# Altium PCB SYNCBOX.PcbDoc (part 2 of 6)
Units mil, origin at the board's own origin, x right, y up, seen from the top; angles counter-clockwise.
Board outline 8392.2 x 6163.59 mil, 6 copper layers (L1, L2, L3, L4 (PWR), L5, L6), stack 60.709 mil thick; 316 components, 422 nets, 1421 pads, 499 vias.
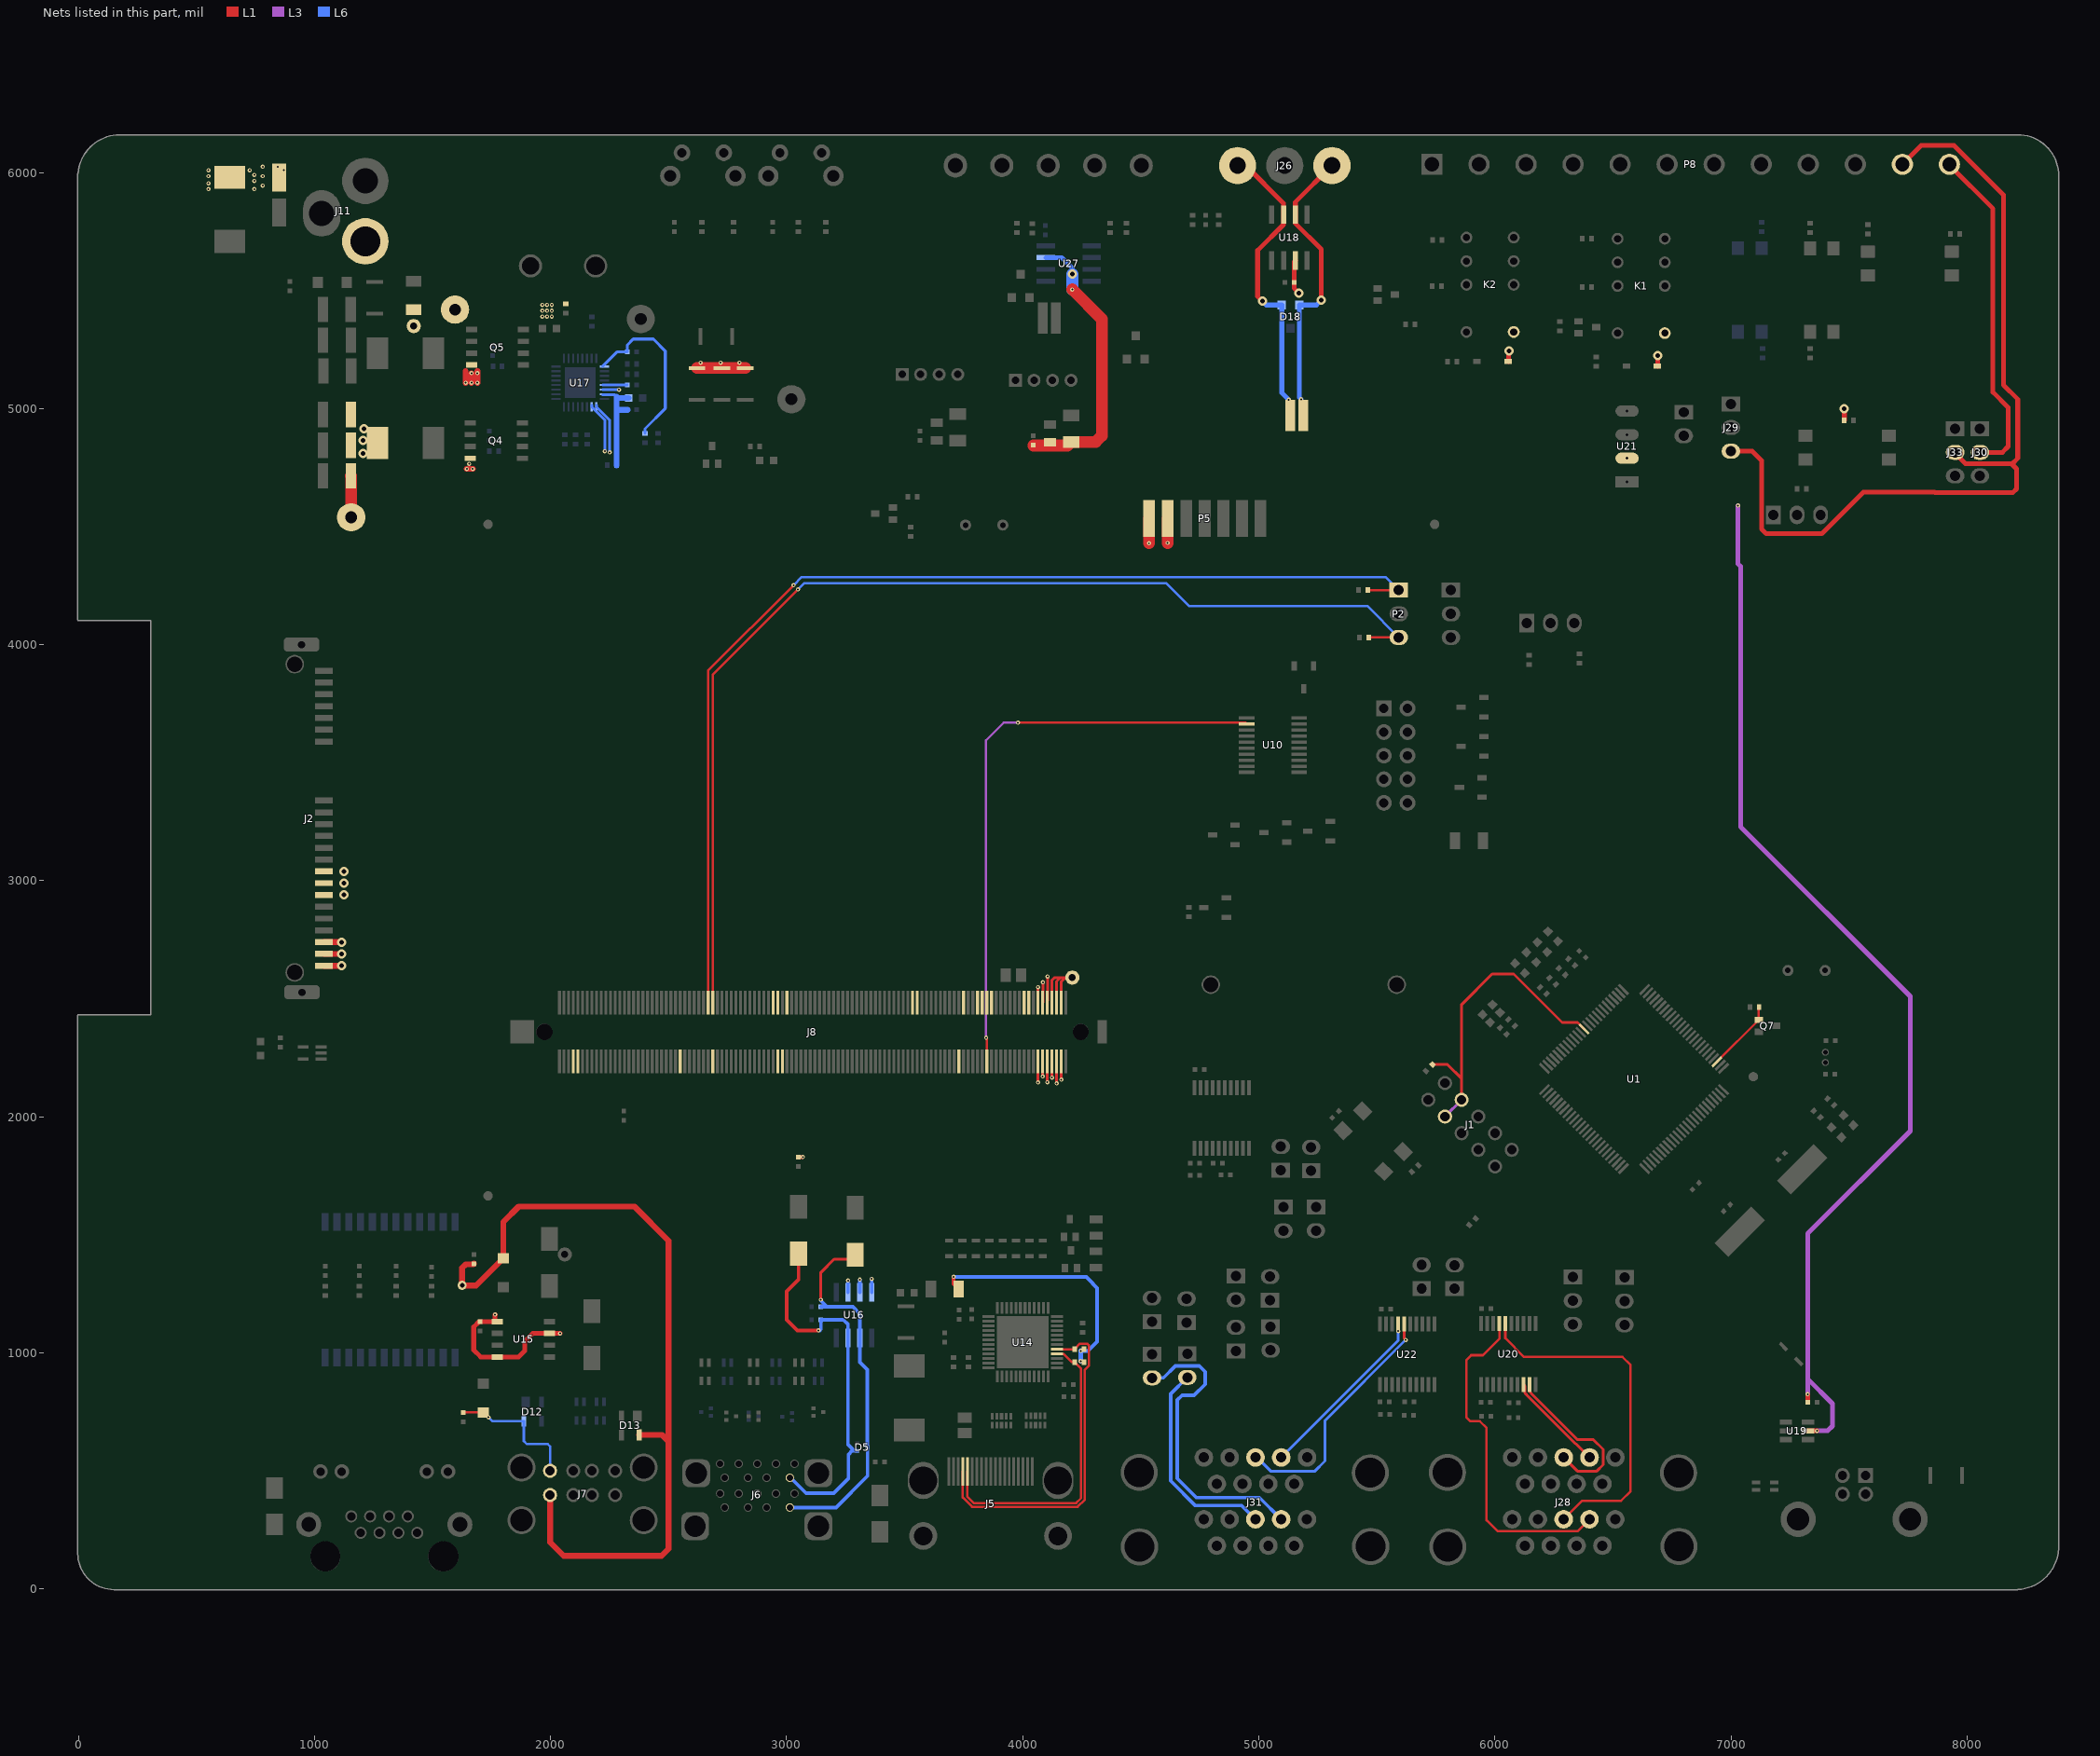
[diagram p6: the nets of this part, all layers, seen from the top]

## Part data
BT1: library part CR2032, "BATTERY HOLDER COIN 20MM PC PIN", Manufacturer 2="Memory Protection Devices", Manufacturer Part Number=BS-7, Operating Temperature="-55°C ~ 105°C", Standard Package=100, Supplier Part Number 1=BS7, .Checked PCB=CHK, .Checked SCH=CHK, Battery Cell Size="Coin, 20.0mm", Battery Series=2032, Battery Type, Function="Coin Cell, Holder", Category="Battery Products", ComponentLink1Description=http://www.memoryprotectiondevices.com/datasheets/BS-7-datasheet.pdf?src-supplier=Digi-Key, ComponentLink1URL=http://www.memoryprotectiondevices.com/datasheets/BS-7-datasheet.pdf?src-supplier=Digi-Key, Description 2="BATTERY HOLDER COIN 20MM PC PIN", Family="Battery Holders, Clips, Contacts", Featured Product="Top and Side Loading Coin Cell Holders Ultra-Low CR2016 Coin Cell Holder Covered 8-AA Battery Pack Cylindrical Battery Contacts", For Use With="P188-ND  /                                                          - BATTERY LITHIUM 3V COIN 20MM /                                                      P138-ND  /                                                          - BATTERY LITHIUM 3V COIN 20MM /                                                      P189-ND  /                                                          - BATTERY LITHIUM 3V COIN 20MM /                                                      N138-ND  /                                                          - BATTERY LITHIUM 3V COIN 20MM /                                                      N188-ND  /                                                          - BATTERY LITHIUM 3V COIN 20MM /                                                      P186-ND  /                                                          - BATTERY LITHIUM 3V COIN 20MM /                                                      SY189-ND  /                                                          - BATTERY LITHIUM 3V COIN 20MM /                                                      SY138-ND  /                                                          - BATTERY LITHIUM 3V COIN 20MM /                                                      SY188-ND  /                                                          - BATTERY LITHIUM 3V COIN 20MM /                                                      N189-ND  /                                                          - BATTERY LITHIUM 3V COIN 20MM /                                                      P037-ND  /                                                          - BATTERY LITHIUM 3V COIN 20MM /                                                      N037-ND  /                                                          - BATTERY LITHIUM 3V COIN 20MM /                                                      ECR2032BP-ND  /                                                          - BATTERY LITH 3V COIN 20MM", Height Above Board="0.354\" (9.00mm)", Manufacturer Part Number 2=BS-7, Mounting Type="PCB, Through Hole", Number of Cells=1, Online Catalog="Battery Holders, Clips, Contacts", Other Names=BS7, Product Training Modules="Battery Holders for Wireless Applications", RoHS Information="Cert of Compliance", Stock 2=0, Style="Holder (Open)", Supplier 1="Electro Sonic", Supplier 2="Perfect Parts", Supplier Part Number 2=BS-7, Termination Style="PC Pin"
C1 C2: library part CL05C120JB5NNNC, "CAP CER 12PF 50V C0G 5% 0402", Supplier Part Number=1276-1178-1-ND, Manufacturer Part Number=CL05C120JB5NNNC
C3 C4: library part CL05C180JB5NNNC, "CAP CER 18PF 50V C0G/NP0 0402", Manufacturer 1="Samsung Electro-Mechanics", Operating Temperature="-55°C ~ 125°C", Package / Case="0402 (1005 Metric)", Ratings=-, Supplier Part Number 1=1276-1140-1-ND, Temperature Coefficient="C0G, NP0", Tolerance=±5%, Voltage - Rated=50V, Applications="General Purpose", Category=Capacitors, ComponentLink1Description=http://www.samsungsem.com/kr/support/product-search/mlcc/CL05C180JB5NNNC.jsp, ComponentLink1URL=http://www.samsungsem.com/kr/support/product-search/mlcc/CL05C180JB5NNNC.jsp, Description 1="CAP CER 18PF 50V C0G/NP0 0402", Features=-, Height - Seated (Max)=-, Lead Spacing=-, Lead Style=-, Manufacturer Part Number 1=CL05C180JB5NNNC, Mounting Type="Surface Mount, MLCC", Notification="Current market demand for these product types have resulted in fluctuating and extending lead times. Lead times may differ.", Packaging="Cut Tape (CT)", Part Status=Active, Pricing 1="1=0.1, 10=0.034, 100=0.0154, 500=0.01114, 1000=0.00888, 2500=0.00814, 5000=0.00753 (USD)", RoHS="RoHS Compliant", Size / Dimension="0.039\" L x 0.020\" W (1.00mm x 0.50mm)", Stock 1=89300, Supplier 1=Digi-Key, Thickness (Max)="0.022\" (0.55mm)"
C5 C7 C8 C13 C29 C30 C31 C32 C33 C36 C37 C41 C46 C47 C55 C57 C58 C59 C61 C62: library part CL05A104KA5NNNC, "CAP CER 0.1UF 50V X8R 0603", Manufacturer 1="Samsung Electro-Mechanics", Operating Temperature="-55°C ~ 85°C", Package / Case="0402 (1005 Metric)", Ratings=-, Supplier Part Number 1=1276-1043-6-ND, Temperature Coefficient=X5R, Tolerance=±10%, Voltage - Rated=25V, Applications="General Purpose", Category=Capacitors, ComponentLink1Description=http://www.samsungsem.com/kr/support/product-search/mlcc/CL05A104KA5NNNC.jsp, ComponentLink1URL=http://www.samsungsem.com/kr/support/product-search/mlcc/CL05A104KA5NNNC.jsp, Description 1="CAP CER 0.1UF 25V X5R 0402", Features=-, Height - Seated (Max)=-, Lead Spacing=-, Lead Style=-, Manufacturer Part Number 1=CL05A104KA5NNNC, Mounting Type="Surface Mount, MLCC", Notification="Current market demand for these product types have resulted in fluctuating and extending lead times. Lead times may differ.", Packaging=Digi-Reel®, Part Status=Active, Pricing 1="1=0.1, 10=0.04, 100=0.0176, 500=0.0126, 1000=0.0099, 2500=0.009, 5000=0.00828 (USD)", RoHS="RoHS Compliant", Size / Dimension="0.039\" L x 0.020\" W (1.00mm x 0.50mm)", Stock 1=100000, Supplier 1=Digi-Key, Thickness (Max)="0.022\" (0.55mm)"
  C8 C13: .Checked PCB=USED, .Checked SCH=USED
  C29: .Checked SCH=CHK
C6 C9 C10 C11 C12 C16 C17 C18 C19 C64 C65 C66 C68 C69 C70 C71 C72 C73 C74 C75 C76 C77 C78 C79 C80 C81 C82 C83: library part CL05A104KA5NNNC, "CAP CER 0.1UF 25V X5R 0402", Manufacturer 1="Samsung Electro-Mechanics", Operating Temperature="-55°C ~ 85°C", Package / Case="0402 (1005 Metric)", Ratings=-, Supplier Part Number 1=1276-1043-6-ND, Temperature Coefficient=X5R, Tolerance=±10%, Voltage - Rated=25V, Applications="General Purpose", Category=Capacitors, ComponentLink1Description=http://www.samsungsem.com/kr/support/product-search/mlcc/CL05A104KA5NNNC.jsp, ComponentLink1URL=http://www.samsungsem.com/kr/support/product-search/mlcc/CL05A104KA5NNNC.jsp, Description 1="CAP CER 0.1UF 25V X5R 0402", Features=-, Height - Seated (Max)=-, Lead Spacing=-, Lead Style=-, Manufacturer Part Number 1=CL05A104KA5NNNC, Mounting Type="Surface Mount, MLCC", Notification="Current market demand for these product types have resulted in fluctuating and extending lead times. Lead times may differ.", Packaging=Digi-Reel®, Part Status=Active, Pricing 1="1=0.1, 10=0.04, 100=0.0176, 500=0.0126, 1000=0.0099, 2500=0.009, 5000=0.00828 (USD)", RoHS="RoHS Compliant", Size / Dimension="0.039\" L x 0.020\" W (1.00mm x 0.50mm)", Stock 1=100000, Supplier 1=Digi-Key, Thickness (Max)="0.022\" (0.55mm)"
  C6 C9 C10 C11 C12 C16 C17 C18 C19 C64 C66 C68 C69 C70 C71 C72 C73 C74 C75 C76 C77 C78 C79 C80 C81 C82: .Checked SCH=CHK
C14 C15: library part C1206X102KGRACAUTO, "CAP CER 1206 1NF 2000V X7R 10% F", Manufacturer 1=KEMET, Operating Temperature="-55°C ~ 125°C", Package / Case="1206 (3216 Metric)", Ratings=AEC-Q200, Supplier Part Number 1=399-16730-1-ND, Temperature Coefficient=X7R, Tolerance=±10%, Voltage - Rated="2000V (2kV)", .Checked PCB=USED, .Checked SCH=USED, Applications="Automotive, Boardflex Sensitive", Category=Capacitors, ComponentLink1Description=https://api.kemet.com/component-edge/download/datasheet/C1206X102KGRACAUTO.pdf, ComponentLink1URL=https://api.kemet.com/component-edge/download/datasheet/C1206X102KGRACAUTO.pdf, Description 1="CAP CER 1206 1NF 2000V X7R 10% F", Failure Rate=-, Features="Low ESL, Soft Termination, High Voltage", Height - Seated (Max)=-, Lead Spacing=-, Lead Style=-, Manufacturer Part Number 1=C1206X102KGRACAUTO, Mounting Type="Surface Mount, MLCC", Packaging="Cut Tape (CT)", Part Status=Active, Pricing 1="1=0.79, 10=0.58, 100=0.3974, 500=0.31464, 1000=0.26496 (USD)", RoHS="RoHS Compliant", Size / Dimension="0.130\" L x 0.063\" W (3.30mm x 1.60mm)", Stock 1=7503, Supplier 1=Digi-Key, Thickness (Max)="0.073\" (1.85mm)"
C20 C21 C22 C23 C24 C25 C26 C27: library part C1608X8R1H104K08, "CAP CER 0.1UF 25V X5R 0402", Manufacturer 1="TDK Corporation", Manufacturer_Part_Number=C1608X8R1H104K080AB, Operating Temperature="-55°C ~ 150°C", Package / Case="0603 (1608 Metric)", Ratings=-, Supplier Part Number 1=445-8818-1-ND, Temperature Coefficient=X8R, Tolerance=±10%, Voltage - Rated=50V, .Checked SCH=CHK, Applications="General Purpose", Built_By=EMA_UL_Team, C="Copyright (C) 2015 Accelerated Designs. All rights reserved", Category=Capacitors, Description 1="CAP CER 0.1UF 50V X8R 0603", Failure Rate=-, Features="High Temperature", Height - Seated (Max)=-, Lead Spacing=-, Lead Style=-, Manufacturer Part Number 1=C1608X8R1H104K080AB, Mounting Type="Surface Mount, MLCC", Notification="Current market demand for these product types have resulted in fluctuating and extending lead times. Lead times may differ.", Packaging="Cut Tape (CT)", Part Status=Active, Pricing 1="1=0.32, 10=0.216, 100=0.1093, 500=0.07476, 1000=0.06613 (USD)", RefDes=RefDes, RoHS="RoHS Compliant", Size / Dimension="0.063\" L x 0.032\" W (1.60mm x 0.80mm)", Stock 1=5228, Supplier 1=Digi-Key, Thickness (Max)="0.035\" (0.90mm)", Type=DEV, Vendor=TDK
C28 C43 C44 C63: library part C3216JB1V106K160, "CAP CER 10UF 35V JB 1206", Manufacturer 1="TDK Corporation", Manufacturer_Part_Number=C3216JB1V106K160AB, Operating Temperature="-25°C ~ 85°C", Package / Case="1206 (3216 Metric)", Ratings=-, Supplier Part Number 1=445-11736-1-ND, Temperature Coefficient=JB, Tolerance=±10%, Voltage - Rated=35V, Applications="General Purpose", Built_By=EMA_UL_Team, C="Copyright (C) 2015 Accelerated Designs. All rights reserved", Category=Capacitors, ComponentLink1Description=https://product.tdk.com/info/en/catalog/datasheets/mlcc_commercial_general_en.pdf, ComponentLink1URL=https://product.tdk.com/info/en/catalog/datasheets/mlcc_commercial_general_en.pdf, Description 1="CAP CER 10UF 35V JB 1206", Failure Rate=-, Features="Low ESL", Height - Seated (Max)=-, Lead Spacing=-, Lead Style=-, Manufacturer Part Number 1=C3216JB1V106K160AB, Mounting Type="Surface Mount, MLCC", Notification="Current market demand for these product types have resulted in fluctuating and extending lead times. Lead times may differ.", Packaging="Cut Tape (CT)", Part Status=Active, Pricing 1="1=0.92, 10=0.648, 100=0.4269, 500=0.31626, 1000=0.26881 (USD)", RefDes=RefDes, RoHS="RoHS Compliant", Size / Dimension="0.126\" L x 0.063\" W (3.20mm x 1.60mm)", Stock 1=5285, Supplier 1=Digi-Key, Thickness (Max)="0.069\" (1.75mm)", Type=DEV, Vendor=TDK
  C28: .Checked SCH=CHK
C34 C35 C38 C39: library part PCG1C470MCL1GS, "CAP ALUM POLY 47UF 20% 16V SMD", ESR (Equivalent Series Resistance)="40 mOhm", Lifetime @ Temp.="2000 Hrs @ 105°C", Manufacturer 1=Nichicon, Operating Temperature="-55°C ~ 105°C", Package / Case="Radial, Can - SMD", Ratings=-, Supplier Part Number 1=493-3095-6-ND, Tolerance=±20%, Applications="General Purpose", Category=Capacitors, ComponentLink1Description=http://nichicon-us.com/english/products/pdfs/e-pcg.pdf, ComponentLink1URL=http://nichicon-us.com/english/products/pdfs/e-pcg.pdf, Description 1="CAP ALUM POLY 47UF 20% 16V SMD", Height - Seated (Max)="0.236\" (6.00mm)", Lead Spacing=-, Manufacturer Part Number 1=PCG1C470MCL1GS, Mounting Type="Surface Mount", Packaging=Digi-Reel®, Part Status=Active, Pricing 1="1=1.42, 10=1.123, 100=0.8422, 500=0.63636 (USD)", RoHS="RoHS Compliant", Size / Dimension="0.197\" Dia (5.00mm)", Stock 1=4045, Supplier 1=Digi-Key, Surface Mount Land Size="0.209\" L x 0.209\" W (5.30mm x 5.30mm)", Type=Polymer
C40: library part C1608X5R0J106M, "CAP CER 10UF 6.3V X5R 20% 0603", Capacitance=10µF, Manufacturer="TDK Corporation", Operating Temperature="-55°C ~ 85°C", Package / Case="0603 (1608 Metric)", Ratings=-, Supplier Part Number=445-4112-1-ND, Temperature Coefficient=X5R, Tolerance=±20%, Voltage - Rated=6.3V, Applications="General Purpose", Category=Capacitors, ComponentLink1Description=http://www.tdk.com/pdf/general_B11.pdf, ComponentLink1URL=http://www.tdk.com/pdf/general_B11.pdf, Features="Low ESR", Height - Seated (Max)=-, Lead Spacing=-, Lead Style=-, Manufacturer Part Number=C1608X5R0J106M, Mounting Type="Surface Mount, MLCC", Packaging="Cut Tape (CT)", Price 1k [$]=0.08580, Pricing 1="1=0.46, 10=0.363, 100=0.1898, 250=0.14024, 500=0.1089, 1000=0.0858 (USD)", RoHS="RoHS Compliant", Size / Dimension="0.063\" L x 0.031\" W (1.60mm x 0.80mm)", Stock 1=48157, Supplier=Digikey, Supplier 1=Digi-Key, Supplier Part Number 1=445-4112-1-ND, Thickness (Max)="0.037\" (0.95mm)"
C42 C45 C67: library part CGA5L3X8R1H105K1, "CAP CER 1UF 50V X8R 1206", Manufacturer 1="TDK Corporation", Manufacturer_Part_Number=CGA5L3X8R1H105K160AB, Operating Temperature="-55°C ~ 150°C", Package / Case="1206 (3216 Metric)", Ratings=AEC-Q200, Supplier Part Number 1=445-13000-1-ND, Temperature Coefficient=X8R, Tolerance=±10%, Voltage - Rated=50V, Applications=Automotive, Built_By=EMA_UL_Team, C="Copyright (C) 2015 Accelerated Designs. All rights reserved", Category=Capacitors, ComponentLink1Description=https://product.tdk.com/info/en/catalog/datasheets/mlcc_automotive_hightemp_en.pdf, ComponentLink1URL=https://product.tdk.com/info/en/catalog/datasheets/mlcc_automotive_hightemp_en.pdf, Description 1="CAP CER 1UF 50V X8R 1206", Failure Rate=-, Features="High Temperature", Height - Seated (Max)=-, Lead Spacing=-, Lead Style=-, Manufacturer Part Number 1=CGA5L3X8R1H105K160AB, Mounting Type="Surface Mount, MLCC", Packaging="Cut Tape (CT)", Part Status=Active, Pricing 1="1=0.85, 10=0.628, 100=0.4306, 500=0.34086, 1000=0.28704 (USD)", RefDes=RefDes, RoHS="RoHS Compliant", Size / Dimension="0.126\" L x 0.063\" W (3.20mm x 1.60mm)", Stock 1=3285, Supplier 1=Digi-Key, Thickness (Max)="0.071\" (1.80mm)", Type=DEV, Vendor=TDK
  C67: .Checked SCH=CHK
C48 C49 C50 C51 C52 C53: library part CL32A107MPVNNNE, "CAP CER 100UF 10V X5R 1210", Manufacturer 1="Samsung Electro-Mechanics", Manufacturer_Part_Number=C1210C107M8PACTU, Operating Temperature="-55°C ~ 85°C", Package / Case="1210 (3225 Metric)", Ratings=-, Supplier Part Number 1=1276-3364-1-ND, Temperature Coefficient=X5R, Tolerance=±20%, Voltage - Rated=10V, Applications="General Purpose", Built_By=EMA_UL_Team, C="Copyright (C) 2015 Accelerated Designs. All rights reserved", Category=Capacitors, ComponentLink1Description=http://www.samsungsem.com/kr/support/product-search/mlcc/CL32A107MPVNNNE.jsp, ComponentLink1URL=http://www.samsungsem.com/kr/support/product-search/mlcc/CL32A107MPVNNNE.jsp, Description 1="CAP CER 100UF 10V X5R 1210", Features=-, Height - Seated (Max)=-, Lead Spacing=-, Lead Style=-, Manufacturer Part Number 1=CL32A107MPVNNNE, Mounting Type="Surface Mount, MLCC", Notification="Current market demand for these product types have resulted in fluctuating and extending lead times. Lead times may differ.", Packaging="Cut Tape (CT)", Part Status=Active, Pricing 1="1=1.23, 10=0.97, 100=0.7277, 500=0.54984 (USD)", RefDes=RefDes, RoHS="RoHS Compliant", Size / Dimension="0.126\" L x 0.098\" W (3.20mm x 2.50mm)", Stock 1=10000, Supplier 1=Digi-Key, Thickness (Max)="0.110\" (2.80mm)", Type=DEV, Vendor=Kemet
C54: library part C1005X7R1C103K, "CAP CER 10000PF 16V X7R 10% 0402", Capacitance=10000pF, Manufacturer="TDK Corporation", Operating Temperature="-55°C ~ 125°C", Package / Case="0402 (1005 Metric)", Ratings=-, Supplier Part Number=445-1262-1-ND, Temperature Coefficient=X7R, Tolerance=±10%, Voltage - Rated=16V, Applications="General Purpose", Category=Capacitors, ComponentLink1Description=http://www.tdk.co.jp/tefe02/e412_c.pdf, ComponentLink1URL=http://www.tdk.co.jp/tefe02/e412_c.pdf, Features=-, Height - Seated (Max)=-, Lead Spacing=-, Lead Style=-, Manufacturer Part Number=C1005X7R1C103K, Mounting Type="Surface Mount, MLCC", Packaging="Cut Tape (CT)", Price 1k [$]=0.00416, Pricing 1="1=0.08, 10=0.05, 100=0.018, 250=0.013, 500=0.0096, 1000=0.0065 (USD)", RoHS="RoHS Compliant", Size / Dimension="0.039\" L x 0.020\" W (1.00mm x 0.50mm)", Stock 1=511497, Supplier=Digikey, Supplier 1=Digi-Key, Supplier Part Number 1=445-1262-1-ND, Thickness (Max)="0.022\" (0.55mm)"
C56 C60: library part CL21A226MOCLRNC, "CAP CER 22UF 16V X5R 0805", Manufacturer 1="Samsung Electro-Mechanics", Operating Temperature="-55°C ~ 85°C", Package / Case="0805 (2012 Metric)", Ratings=-, Supplier Part Number 1=1276-6780-1-ND, Temperature Coefficient=X5R, Tolerance=±20%, Voltage - Rated=16V, Applications="General Purpose", Category=Capacitors, ComponentLink1Description=http://www.samsungsem.com/kr/support/product-search/mlcc/CL21A226MOCLRNC.jsp, ComponentLink1URL=http://www.samsungsem.com/kr/support/product-search/mlcc/CL21A226MOCLRNC.jsp, Description 1="CAP CER 22UF 16V X5R 0805", Features="Low Profile", Height - Seated (Max)=-, Lead Spacing=-, Lead Style=-, Manufacturer Part Number 1=CL21A226MOCLRNC, Mounting Type="Surface Mount, MLCC", Notification="Current market demand for these product types have resulted in fluctuating and extending lead times. Lead times may differ.", Packaging="Cut Tape (CT)", Part Status=Active, Pricing 1="1=0.34, 10=0.233, 100=0.132, 500=0.09318, 1000=0.08153 (USD)", RoHS="RoHS Compliant", Size / Dimension="0.079\" L x 0.049\" W (2.00mm x 1.25mm)", Stock 1=40000, Supplier 1=Digi-Key, Thickness (Max)="0.037\" (0.95mm)"
D1 D2 D27: library part "LS Q976-NR-1", "LED RED DIFFUSED 0603 SMD", Color=Red, Current - Test=20mA, Lens Color=White, Manufacturer 1="OSRAM Opto Semiconductors Inc.", Millicandela Rating=104mcd, Package / Case="0603 (1608 Metric)", Supplier Device Package=0603, Supplier Part Number 1=475-2512-1-ND, Voltage - Forward (Vf) (Typ)=2V, Category=Optoelectronics, ComponentLink1Description=https://dammedia.osram.info/media/resource/hires/osram-dam-2493499/LS%20Q976.pdf, ComponentLink1URL=https://dammedia.osram.info/media/resource/hires/osram-dam-2493499/LS%20Q976.pdf, Description 1="LED RED DIFFUSED 0603 SMD", Features=-, Height (Max)=0.80mm, LatestRevisionDate=08-Jul-2005, LatestRevisionNote="Mech Layer 1 removed.", Lens Style/Size="Rectangle with Flat Top, 1.00mm x 0.80mm", Lens Transparency=Diffused, Manufacturer Part Number 1="LS Q976-NR-1", Mounting Type="Surface Mount", PackageDescription="LED; 2 Leads", PackageReference=LED-0, Packaging="Cut Tape (CT)", Part Status=Active, Pricing 1="1=0.38, 10=0.274, 25=0.202, 100=0.1444, 250=0.0982, 500=0.08664, 1000=0.06787 (USD)", Published=8-Jun-2000, Publisher="Altium Limited", RoHS="RoHS Compliant", Size / Dimension="1.60mm L x 0.80mm W", Stock 1=127302, Supplier 1=Digi-Key, Viewing Angle=160°, Wavelength - Dominant=633nm, Wavelength - Peak=645nm
  D27: .Checked SCH=CHK
D3: "LED RED DIFFUSED 1608 SMD", Color=Red, Current - Test=20mA, Lens Color=White, Manufacturer 1="Rohm Semiconductor", Millicandela Rating=40mcd, Package / Case="0603 (1608 Metric)", Supplier Device Package="1608 (0603)", Voltage - Forward (Vf) (Typ)=2.2V, .Checked PCB=CHK, .Checked SCH=CHK, Category=Optoelectronics, ComponentLink1Description=http://www.rohm.com/web/global/datasheet/SML-D12V1W?src-supplier=Digi-Key, ComponentLink1URL=http://www.rohm.com/web/global/datasheet/SML-D12V1W?src-supplier=Digi-Key, ComponentLink2Description=https://www.rohm.com/datasheet/SML-D12V1W?src-supplier=Digi-Key, ComponentLink2URL=https://www.rohm.com/datasheet/SML-D12V1W?src-supplier=Digi-Key, Description 1="LED RED DIFFUSED 1608 SMD", Family="LED Indication - Discrete", Features=-, Height (Max)=0.65mm, Lens Style/Size="Rectangle with Flat Top, 1.20mm x 0.80mm", Lens Transparency=Diffused, Manufacturer Part Number 1=SML-D12V1WT86, Mounting Type="Surface Mount", Packaging="Tape & Reel (TR)", Pricing 1="3000=0.0245, 6000=0.023, 12000=0.0217, 18000=0.0205, 30000=0.0199 (USD)", Series=SML-D12, Size / Dimension="1.60mm L x 0.80mm W", Stock 1=3000, Supplier 1=Avnet, Supplier Part Number 1=SML-D12V1WT86, Viewing Angle=-, Wavelength - Dominant=630nm, Wavelength - Peak=-
D4 D15: "DIODE SCHOTTKY 60V 5A SMC", Capacitance @ Vr, F="300pF @ 4V, 1MHz", Current - Average Rectified (Io)=5A, Current - Reverse Leakage @ Vr="500µA @ 60V", Manufacturer="Diodes Inc", Package / Case="DO-214AB, SMC", Supplier Device Package=SMC, Supplier Part Number=B560C-FDICT-ND, Voltage - DC Reverse (Vr) (Max)=60V, Voltage - Forward (Vf) (Max) @ If="700mV @ 5A", Category="Discrete Semiconductor Products", ComponentLink1Description=http://www.diodes.com/datasheets/ds13012.pdf, ComponentLink1URL=http://www.diodes.com/datasheets/ds13012.pdf, Diode Type=Schottky, Family="Diodes, Rectifiers - Single", Manufacturer Part Number=B560C-13-F, Mounting Type="Surface Mount", Packaging="Cut Tape (CT)", Price 1k [$]=0.42900, Pricing 1="1=0.99, 10=0.884, 100=0.702, 250=0.611, 500=0.546, 1000=0.429 (USD)", Reverse Recovery Time (trr)=-, RoHS="RoHS Compliant", Speed="Fast Recovery =< 500ns, > 200mA (Io)", Stock 1=37770, Supplier=Digikey, Supplier 1=Digi-Key, Supplier Part Number 1=B560C-FDICT-ND
  D4: .Checked SCH=CHK
D5 D6 D7 D8 D9 D10 D11: "TVS DIODE 5.3V 15V TSFP-3", Base Part Number=ESD5V3, Capacitance @ Frequency="0.4pF @ 1MHz", Current - Peak Pulse (10/1000µs)="3A (8/20µs)", Manufacturer 1="Infineon Technologies", Operating Temperature="-40°C ~ 125°C (TJ)", Package / Case=SOT-723, Power - Peak Pulse=-, Power Line Protection=No, Supplier Device Package=PG-TSFP-3, Supplier Part Number 1=ESD5V3U2U03FH6327XTSA1CT-ND, Voltage - Breakdown (Min)=6V, Voltage - Clamping (Max) @ Ipp=15V, Voltage - Reverse Standoff (Typ)="5.3V (Max)", Applications="General Purpose", Category="Circuit Protection", ComponentLink1Description=https://www.infineon.com/dgdl/esd5v3u2useries.pdf?folderId=db3a30431441fb5d011488a9e66f0ded&fileId=db3a30431b0626df011b0d3e3ca97dc0, ComponentLink1URL=https://www.infineon.com/dgdl/esd5v3u2useries.pdf?folderId=db3a30431441fb5d011488a9e66f0ded&fileId=db3a30431b0626df011b0d3e3ca97dc0, Description 1="TVS DIODE 5.3V 15V TSFP-3", Manufacturer Part Number 1=ESD5V3U2U03FH6327XTSA1, Mounting Type="Surface Mount", Packaging="Cut Tape (CT)", Part Status=Active, Pricing 1="1=0.38, 10=0.311, 100=0.2118, 500=0.15886, 1000=0.11915 (USD)", RoHS="RoHS Compliant", Stock 1=21994, Supplier 1=Digi-Key, Type=Zener
  D6 D7 D8 D9 D10 D11: .Checked PCB=USED, .Checked SCH=USED
D12 D13: "DIODE BRIDGE 40V 200MA SOT 143", Base Part Number=BAS4002, Manufacturer 1="Infineon Technologies", Operating Temperature="150°C (TJ)", Package / Case="TO-253-4, TO-253AA", Supplier Device Package=PG-SOT143-4, Supplier Part Number 1=BAS4002ARPPE6327HTSA1DKR-ND, .Checked PCB=USED, .Checked SCH=USED, Category="Discrete Semiconductor Products", ComponentLink1Description=https://www.infineon.com/dgdl/bas4002aseries.pdf?folderId=db3a30431f848401011fcbf2ab4c04c4&fileId=db3a304329a0f6ee0129a6dc9f802b68, ComponentLink1URL=https://www.infineon.com/dgdl/bas4002aseries.pdf?folderId=db3a30431f848401011fcbf2ab4c04c4&fileId=db3a304329a0f6ee0129a6dc9f802b68, Description 1="DIODE BRIDGE 40V 200MA SOT 143", Diode Type="Single Phase", Manufacturer Part Number 1=BAS4002ARPPE6327HTSA1, Mounting Type="Surface Mount", Packaging=Digi-Reel®, Part Status=Active, Pricing 1="1=0.47, 10=0.406, 100=0.3031, 500=0.23816, 1000=0.18403 (USD)", RoHS="RoHS Compliant", Stock 1=44305, Supplier 1=Digi-Key, Technology=Standard
D14 D17 D24 D25 D26 D28 D29: library part "LW Q38E-Q1OO-3K6L-1", "LED COOL WHITE DIFFUSED 0603 SMD", Color="White, Cool", Current - Test=5mA, Lens Color=Yellow, Manufacturer 1="OSRAM Opto Semiconductors Inc.", Millicandela Rating=81mcd, Package / Case="0603 (1608 Metric)", Supplier Device Package=0603, Supplier Part Number 1=475-2831-1-ND, Voltage - Forward (Vf) (Typ)=2.85V, Category=Optoelectronics, ComponentLink1Description=https://dammedia.osram.info/media/resource/hires/osram-dam-2493068/LW%20Q38E.pdf, ComponentLink1URL=https://dammedia.osram.info/media/resource/hires/osram-dam-2493068/LW%20Q38E.pdf, Description 1="LED COOL WHITE DIFFUSED 0603 SMD", Features=-, Height (Max)=0.40mm, Lens Style/Size="Rectangle with Flat Top, 1.10mm x 0.80mm", Lens Transparency=Diffused, Manufacturer Part Number 1="LW Q38E-Q1OO-3K6L-1", Mounting Type="Surface Mount", Packaging="Cut Tape (CT)", Part Status=Active, Pricing 1="1=0.49, 10=0.354, 25=0.2888, 100=0.231, 250=0.19492, 500=0.16604, 1000=0.12994 (USD)", RoHS="RoHS Compliant", Size / Dimension="1.60mm L x 0.80mm W", Stock 1=215520, Supplier 1=Digi-Key, Viewing Angle="150°, 130°", Wavelength - Dominant=8200K, Wavelength - Peak=-
  D24 D25 D26 D28 D29: .Checked SCH=CHK
D16: "TVS DIODE 12V 19.9V SMA", Capacitance @ Frequency=-, Current - Peak Pulse (10/1000µs)=20.1A, Manufacturer 1="Bourns Inc.", Operating Temperature="-55°C ~ 150°C (TJ)", Package / Case="DO-214AC, SMA", Power - Peak Pulse=400W, Power Line Protection=No, Supplier Device Package="SMA (DO-214AC)", Supplier Part Number 1=SMAJ12ABCT-ND, Voltage - Breakdown (Min)=13.3V, Voltage - Clamping (Max) @ Ipp=19.9V, Voltage - Reverse Standoff (Typ)=12V, Applications="General Purpose", Category="Circuit Protection", ComponentLink1Description=https://www.bourns.com/docs/Product-Datasheets/SMAJ.pdf, ComponentLink1URL=https://www.bourns.com/docs/Product-Datasheets/SMAJ.pdf, Description 1="TVS DIODE 12V 19.9V SMA", LatestRevisionDate=17-Jul-2002, LatestRevisionNote="Re-released for DXP Platform.", Manufacturer Part Number 1=SMAJ12A, Mounting Type="Surface Mount", PackageDescription="Diode, Thru-Hole; 2 Leads; 0.7 in Pin Spacing", PackageReference=DIODE-0.7, Packaging="Cut Tape (CT)", Part Status=Active, Pricing 1="1=0.47, 10=0.329, 25=0.27, 100=0.216, 250=0.15712, 500=0.12766, 1000=0.0982, 2500=0.08838 (USD)", Published=8-Jun-2000, Publisher="Altium Limited", RoHS="RoHS Compliant", Stock 1=20326, Supplier 1=Digi-Key, Type=Zener
D18: "TVS DIODE 24V 40V SOT23", Capacitance @ Frequency="22pF @ 1MHz", Current - Peak Pulse (10/1000µs)="8A (8/20µs)", Manufacturer 1="Bourns Inc.", Manufacturer Part Number 1=CDSOT23-T24CAN, Operating Temperature="-40°C ~ 150°C (TJ)", Package / Case="TO-236-3, SC-59, SOT-23-3", Power - Peak Pulse=-, Power Line Protection=No, Supplier Device Package=SOT-23, Supplier Part Number 1=CDSOT23-T24CANCT-ND, Voltage - Breakdown (Min)=26.2V, Voltage - Clamping (Max) @ Ipp=40V, Voltage - Reverse Standoff (Typ)=24V, .Checked SCH=CHK, Applications=CAN, Category="Circuit Protection", ComponentLink1Description=https://www.bourns.com/docs/Product-Datasheets/CDSOT23-T24CAN.pdf, ComponentLink1URL=https://www.bourns.com/docs/Product-Datasheets/CDSOT23-T24CAN.pdf, Description 1="TVS DIODE 24V 40V SOT23", Mounting Type="Surface Mount", Packaging="Cut Tape (CT)", Part Status=Active, Pricing 1="1=0.57, 10=0.399, 25=0.3272, 100=0.2617, 250=0.19036, 500=0.15466, 1000=0.11897 (USD)", RoHS="RoHS Compliant", Stock 1=26793, Supplier 1=Digi-Key, Type=Zener
D19: library part BAT43WS-7-F, "DIODE SCHOTTKY 30V 200MA SOD323", Capacitance @ Vr, F="10pF @ 1V, 1MHz", Current - Average Rectified (Io)="200mA (DC)", Manufacturer 1="Diodes Incorporated", Operating Temperature - Junction="-55°C ~ 125°C", Package / Case="SC-76, SOD-323", Supplier Device Package=SOD-323, Supplier Part Number 1=BAT43WS-FDICT-ND, .Checked SCH=CHK, Base Part Number=BAT43WS, Category="Discrete Semiconductor Products", ComponentLink1Description=https://www.diodes.com/assets/Datasheets/ds30100.pdf, ComponentLink1URL=https://www.diodes.com/assets/Datasheets/ds30100.pdf, Description 1="DIODE SCHOTTKY 30V 200MA SOD323", Diode Type=Schottky, Manufacturer Part Number 1=BAT43WS-7-F, Mounting Type="Surface Mount", Packaging="Cut Tape (CT)", Part Status=Active, Pricing 1="1=0.47, 10=0.352, 100=0.2028, 500=0.13698, 1000=0.10685 (USD)", RoHS="RoHS Compliant", Speed="Small Signal =< 200mA (Io), Any Speed", Stock 1=45041, Supplier 1=Digi-Key
D20 D21: "DIODE GEN PURP 100V 150MA SOD123", Base Part Number=1N4148W, Capacitance @ Vr, F="2pF @ 0V, 1MHz", Current - Average Rectified (Io)=150mA, Manufacturer 1="Micro Commercial Co", Manufacturer Part Number 1=1N4148W-TP, Operating Temperature - Junction="-65°C ~ 150°C", Package / Case=SOD-123, Supplier Part Number 1=1N4148WTPMSCT-ND, .Checked SCH=CHK, C="Copyright (C) 2015 Accelerated Designs. All rights reserved", Category="Discrete Semiconductor Products", ComponentLink1Description=http://www.mccsemi.com/up_pdf/1N4148W(SOD123).pdf, ComponentLink1URL=http://www.mccsemi.com/up_pdf/1N4148W(SOD123).pdf, Copyright="Copyright (C) 2016 Accelerated Designs. All rights reserved", Description 1="DIODE GEN PURP 100V 150MA SOD123", Diode Type=Standard, Manufacturer_Part_Number=1N4148, Mounting Type="Surface Mount", Packaging="Cut Tape (CT)", Part Status=Active, Pricing 1="1=0.14, 10=0.131, 100=0.0856, 500=0.04186, 1000=0.02854 (USD)", RefDes=RefDes, RoHS="RoHS Compliant", Speed="Small Signal =< 200mA (Io), Any Speed", Stock 1=1984430, Supplier 1=Digi-Key, Supplier Device Package=SOD-123, Type=DEV, Vendor=Nexperia
D22 D23: library part CDSOT23-SM712, "BOURNS - CDSOT23-SM712 - Transient Voltage Suppressor, TVS, CDSOT23 Series, Unidirectional, 12 V, SOT-23, 3, 13.3 V", Capacitance @ Frequency="75pF @ 1MHz", Current - Peak Pulse (10/1000µs)="17A (8/20µs)", Manufacturer 1=Bourns, Operating Temperature="-55°C ~ 150°C (TJ)", Package / Case="TO-236-3, SC-59, SOT-23-3", Power - Peak Pulse=400W, Power Line Protection=No, Standard Package=1, Supplier Device Package=SOT-23-3, Supplier Part Number 1=1653019, Voltage - Breakdown (Min)="7.5V, 13.3V", Voltage - Clamping (Max) @ Ipp="14V, 26V", Voltage - Reverse Standoff (Typ)="7V (Max), 12V (Max)", Applications="General Purpose", Bidirectional Channels=2, Catalog Drawings="CDSOT23-SM712 Schematic", Category="Circuit Protection", ComponentLink1Description=http://www.farnell.com/datasheets/2645121.pdf?src-supplier=Farnell, ComponentLink1URL=http://www.farnell.com/datasheets/2645121.pdf?src-supplier=Farnell, ComponentLink2Description=http://www.bourns.com/docs/Product-Datasheets/CDSOT23-SM712.pdf?src-supplier=Mouser, ComponentLink2URL=http://www.bourns.com/docs/Product-Datasheets/CDSOT23-SM712.pdf?src-supplier=Mouser, ComponentLink3Description=http://www.bourns.com/docs/Product-Datasheets/CDSOT23-SM712.pdf?src-supplier=Avnet, ComponentLink3URL=http://www.bourns.com/docs/Product-Datasheets/CDSOT23-SM712.pdf?src-supplier=Avnet, ComponentLink4Description=http://www.bourns.com/docs/Product-Datasheets/CDSOT23-SM712.pdf?src-supplier=Verical, ComponentLink4URL=http://www.bourns.com/docs/Product-Datasheets/CDSOT23-SM712.pdf?src-supplier=Verical, ComponentLink5Description=https://www.bourns.com/docs/technical-documents/technical-library/circuit-protection/design-notes/bourns_rs485_evalboard4_design_note.pdf?src-supplier=Digi-Key, ComponentLink5URL=https://www.bourns.com/docs/technical-documents/technical-library/circuit-protection/design-notes/bourns_rs485_evalboard4_design_note.pdf?src-supplier=Digi-Key, ComponentLink6Description=http://www.farnell.com/datasheets/2645121.pdf?src-supplier=Element14, ComponentLink6URL=http://www.farnell.com/datasheets/2645121.pdf?src-supplier=Element14, ComponentLink7Description=http://www.bourns.com/docs/Product-Datasheets/CDSOT23-SM712.pdf?src-supplier=Avnet+Europe, ComponentLink7URL=http://www.bourns.com/docs/Product-Datasheets/CDSOT23-SM712.pdf?src-supplier=Avnet+Europe, Description 1="BOURNS - CDSOT23-SM712 - Transient Voltage Suppressor, TVS, CDSOT23 Series, Unidirectional, 12 V, SOT-23, 3, 13.3 V", Family="TVS - Diodes", For Use With="EVAL-CN0313-SDPZ-ND  - EVAL EMC RS-485 CERTIFIED", Kits="PN-DESIGNKIT-22-ND  - KIT ESD/EFT SURGE PROTECTION", Manufacturer Part Number 1=CDSOT23-SM712, Mounting Type="Surface Mount", Online Catalog="CDSOT23 Series", Other Names=CDSOT23-SM712CT, Packaging="Cut Tape (CT)", Product Training Modules="ESD Protection Products", Related Products="ADM3485EARZ-REEL7TR-ND  - IC TXRX RS-485 HS 3.3V 8SOIC ADM3485EARZ-REEL7CT-ND  - IC TXRX RS-485 HS 3.3V 8SOIC ADM3485EARZ-REEL7DKR-ND  - IC TXRX RS-485 HS 3.3V 8SOIC ADM3485EARZ-ND  - IC TX/RX RS-485 HS 3.3V 8-SOIC ADM3485EAR-ND  - IC TX/RX RS-485 HS 3.3V 8-SOIC 296-38503-5-ND  - IC TXRX RS485 3.3V ESD 14SOIC 296-38501-5-ND  - IC RS485 TXRX 3.3 ESD 8SOIC 296-38522-5-ND  - IC TXRX RS485 3.3V 14SOIC 296-38502-5-ND  - IC TXRX RS485 3.3V ESD 14SOIC ADM3485EARZ-REELTR-ND  - IC TXRX RS-485 3.3V 8SOIC ADM3485EARZ-REELCT-ND  - IC TXRX RS-485 3.3V 8SOIC ADM3485EARZ-REELDKR-ND  - IC TXRX RS-485 3.3V 8SOIC 296-40517-2-ND  - IC TXRX RS485 3.3V 14SOIC 296-40517-1-ND  - IC TXRX RS485 3.3V 14SOIC 296-40517-6-ND  - IC TXRX RS485 3.3V 14SOIC 296-40519-2-ND  - IC RS485 TXRX 3.3 ESD 8SOIC 296-40519-1-ND  - IC RS485 TXRX 3.3 ESD 8SOIC 296-40519-6-ND  - IC RS485 TXRX 3.3 ESD 8SOIC 296-40524-2-ND  - IC TXRX RS485 3.3V ESD 8SOIC 296-40524-1-ND  - IC TXRX RS485 3.3V ESD 8SOIC 296-40524-6-ND  - IC TXRX RS485 3.3V ESD 8SOIC 296-40522-2-ND  - IC TXRX RS485 3.3V ESD 14SOIC 296-40522-1-ND  - IC TXRX RS485 3.3V ESD 14SOIC 296-40522-6-ND  - IC TXRX RS485 3.3V ESD 14SOIC 296-40529-2-ND  - IC RS485 TXRX 3.3 ESD 8SOIC 296-40529-1-ND  - IC RS485 TXRX 3.3 ESD 8SOIC 296-40529-6-ND  - IC RS485 TXRX 3.3 ESD 8SOIC 296-40527-2-ND  - IC TXRX RS485 FULL DUPLEX 14SOIC 296-40527-1-ND  - IC TXRX RS485 FULL DUPLEX 14SOIC 296-40527-6-ND  - IC TXRX RS485 FULL DUPLEX 14SOIC 296-40516-2-ND  - IC TXRX RS485 3.3V 10VSSOP 296-40516-1-ND  - IC TXRX RS485 3.3V 10VSSOP 296-40516-6-ND  - IC TXRX RS485 3.3V 10VSSOP 296-40518-2-ND  - IC RS485 TXRX 3.3 ESD 8VSSOP 296-40518-1-ND  - IC RS485 TXRX 3.3 ESD 8VSSOP 296-40518-6-ND  - IC RS485 TXRX 3.3 ESD 8VSSOP 296-40521-2-ND  - IC TXRX RS485 3.3V ESD 10VSSOP 296-40521-1-ND  - IC TXRX RS485 3.3V ESD 10VSSOP 296-40521-6-ND  - IC TXRX RS485 3.3V ESD 10VSSOP 296-40523-2-ND  - IC TXRX RS485 3.3V ESD 8VSSOP 296-40523-1-ND  - IC TXRX RS485 3.3V ESD 8VSSOP 296-40523-6-ND  - IC TXRX RS485 3.3V ESD 8VSSOP 296-40528-2-ND  - IC RS485 TXRX 3.3 ESD 8VSSOP 296-40528-1-ND  - IC RS485 TXRX 3.3 ESD 8VSSOP 296-40528-6-ND  - IC RS485 TXRX 3.3 ESD 8VSSOP 296-40526-2-ND  - IC TXRX RS485 FULL DUPLEX 10VSSO 296-40526-1-ND  - IC TXRX RS485 FULL DUPLEX 10VSSO 296-40526-6-ND  - IC TXRX RS485 FULL DUPLEX 10VSSO SN65HVD74DGK-ND  - IC TXRX RS485 3.3V ESD 8VSSOP", Series=-, Stock 1=30000, Supplier 1=RSComponents, Type=Zener, Unidirectional Channels=-
  D22: .Checked PCB=CHK, .Checked SCH=CHK
F1 F2: "PTC RESET FUSE 6V 750MA 1206", Manufacturer 1="Littelfuse Inc.", Operating Temperature="-40°C ~ 85°C", Package / Case="1206 (3216 Metric), Concave", Ratings=-, Supplier Part Number 1=NANOSMDC075F-2CT-ND, Voltage - Max=6V, Approvals="CSA, TUV, UL", Built_By=EMA_UL_Team, C="Copyright (C) 2015 Accelerated Designs. All rights reserved", Category="Circuit Protection", ComponentLink1Description=http://www.littelfuse.com/~/media/electronics/product_specifications/resettable_ptcs/littelfuse_ptc_nanosmdc075f_2_product_specification.pdf.pdf, ComponentLink1URL=http://www.littelfuse.com/~/media/electronics/product_specifications/resettable_ptcs/littelfuse_ptc_nanosmdc075f_2_product_specification.pdf.pdf, Description 1="PTC RESET FUSE 6V 750MA 1206", Height - Seated (Max)=-, Lead Spacing=-, Manufacturer_Part_Number=NANOSMDC075F-2, Manufacturer Part Number 1=NANOSMDC075F-2, Mounting Type="Surface Mount", Packaging="Cut Tape (CT)", Part Status=Active, Pricing 1="1=0.54, 5=0.528, 10=0.512, 50=0.4306, 100=0.3575, 250=0.325, 500=0.27626, 1000=0.24375 (USD)", RefDes=RefDes, RoHS="RoHS Compliant", Size / Dimension="0.126\" L x 0.063\" W (3.20mm x 1.59mm)", Stock 1=13379, Supplier 1=Digi-Key, Thickness (Max)="0.027\" (0.68mm)", Type=DEV, Vendor="TE Connectivity"
  F1: .Checked PCB=USED, .Checked SCH=USED
F3 F4: "FUSE BOARD MOUNT 1A 125VAC 63VDC", Breaking Capacity @ Rated Voltage="100A AC, 50A DC", Color=-, Manufacturer 1="Bel Fuse Inc.", Operating Temperature="-55°C ~ 125°C", Package / Case="1206 (3216 Metric)", Supplier Part Number 1=507-1077-1-ND, Approvals="CE, CSA, cULus", Category="Circuit Protection", ComponentLink1Description=https://belfuse.com/resources/datasheets/circuitprotection/ds-cp-c1q-series.pdf, ComponentLink1URL=https://belfuse.com/resources/datasheets/circuitprotection/ds-cp-c1q-series.pdf, Description 1="FUSE BOARD MOUNT 1A 125VAC 63VDC", Fuse Type="Board Mount (Cartridge Style Excluded)", Manufacturer Part Number 1="C1Q 1", Mounting Type="Surface Mount", Packaging="Cut Tape (CT)", Part Status=Active, Pricing 1="1=0.33, 5=0.318, 10=0.304, 50=0.2714, 100=0.2526, 250=0.22452, 500=0.18712, 1000=0.17775 (USD)", Response Time=Fast, RoHS="RoHS Compliant", Size / Dimension="0.126\" L x 0.062\" W x 0.023\" H (3.20mm x 1.58mm x 0.58mm)", Stock 1=81500, Supplier 1=Digi-Key
F5: library part 0466004.NR, "FUSE BOARD MNT 4A 32VAC/VDC 1206", Breaking Capacity @ Rated Voltage=50A, Color=-, Manufacturer 1="Littelfuse Inc.", Manufacturer Part Number 1=0466004.NRHF, Operating Temperature="-55°C ~ 90°C", Package / Case="1206 (3216 Metric)", Supplier Part Number 1=F6018DKR-ND, Approvals="CSA, UL", Category="Circuit Protection", ComponentLink1Description=http://www.littelfuse.com/~/media/electronics/datasheets/fuses/littelfuse_fuse_466_datasheet.pdf.pdf, ComponentLink1URL=http://www.littelfuse.com/~/media/electronics/datasheets/fuses/littelfuse_fuse_466_datasheet.pdf.pdf, Description 1="FUSE BOARD MNT 4A 32VAC/VDC 1206", Fuse Type="Board Mount (Cartridge Style Excluded)", Mounting Type="Surface Mount", Packaging=Digi-Reel®, Part Status=Active, Pricing 1="1=0.84, 5=0.812, 10=0.787, 50=0.6618, 100=0.5493, 250=0.4994, 500=0.4245, 1000=0.37455 (USD)", Response Time=Fast, RoHS="RoHS Compliant", Size / Dimension="0.125\" L x 0.060\" W x 0.023\" H (3.18mm x 1.52mm x 0.58mm)", Stock 1=4728, Supplier 1=Digi-Key
FB1: library part BLM18SG221TN1D, "FERRITE CHIP 220 OHM 2500MA 0603", Current Rating=2.5A, DC Resistance (DCR)="40 mOhm Max", Impedance @ Frequency="220 Ohm @ 100MHz", Manufacturer="Murata Electronics North America", Package / Case="0603 (1608 Metric)", Supplier Part Number 1=490-5225-1-ND, .Checked SCH=CHK, Category=Filters, ComponentLink1Description=http://search.murata.co.jp/Ceramy/image/img/PDF/ENG/L0110S0100BLM18S.pdf, ComponentLink1URL=http://search.murata.co.jp/Ceramy/image/img/PDF/ENG/L0110S0100BLM18S.pdf, Filter Type="Differential Mode - Single", Height (Max)="0.037\" (0.95mm)", Manufacturer Part Number=BLM18SG221TN1D, Mounting Type="Surface Mount", Number of Lines=1, Packaging="Cut Tape (CT)", Pricing 1="1=0.38, 10=0.282, 50=0.1646, 100=0.1316, 250=0.094, 500=0.06392, 1000=0.0517, 5000=0.04042 (USD)", RoHS="RoHS Compliant", Size / Dimension="0.063\" L x 0.031\" W (1.60mm x 0.80mm)", Stock 1=54640, Supplier 1=Digi-Key
FB2 FB3 FB4: library part FB742792114, "FERRITE BEAD 50 OHM 1206 1LN", Current Rating (Max)=3A, DC Resistance (DCR) (Max)="25 mOhm", Manufacturer 2="Wurth Electronics Inc.", Operating Temperature="-55°C ~ 125°C", Package / Case="1206 (3216 Metric)", Ratings=-, Supplier Part Number 1=732-1621-6-ND, Category=Filters, ComponentLink1Description=http://katalog.we-online.de/pbs/datasheet/742792114.pdf, ComponentLink1URL=http://katalog.we-online.de/pbs/datasheet/742792114.pdf, Description 2="FERRITE BEAD 50 OHM 1206 1LN", Filter Type="Signal Line", Height (Max)="0.051\" (1.30mm)", Manufacturer Part Number 2=742792114, Mounting Type="Surface Mount", Packaging="Cut Tape (CT)", Part Status=Active, Pricing 2="1=0.24, 10=0.238, 50=0.219, 100=0.209, 500=0.2, 1000=0.19 (USD)", RoHS="RoHS Compliant", Size / Dimension="0.126\" L x 0.063\" W (3.20mm x 1.60mm)", Stock 2=21934, Supplier 1=Digi-Key, Supplier 2=Digi-Key, Supplier Part Number 2=732-1621-1-ND
FID1 FID2 FID3 FID4: "Fiducial 40mil Diameter, 120mil Mask", Supplier=Digikey
J1: library part 67997-410HLF, "CONN HEADER 10POS .100 STR TIN", Current Rating=-, Insulation Color=Black, Manufacturer 1="Amphenol FCI", Material Flammability Rating="UL94 V-0", Supplier Part Number 1=609-3243-ND, Applications=-, Built_By=EMA_UL_Team, C="Copyright (C) 2015 Accelerated Designs. All rights reserved", Category="Connectors, Interconnects", ComponentLink1Description=https://cdn.amphenol-icc.com/media/wysiwyg/files/drawing/67996.pdf, ComponentLink1URL=https://cdn.amphenol-icc.com/media/wysiwyg/files/drawing/67996.pdf, Connector Type=Header, Contact Finish - Mating=Tin, Contact Finish - Post=Tin, Contact Finish Thickness - Mating="100.0µin (2.54µm)", Contact Finish Thickness - Post=-, Contact Length - Mating="0.230\" (5.84mm)", Contact Length - Post="0.120\" (3.05mm)", Contact Material="Phosphor Bronze", Contact Shape=Square, Contact Type="Male Pin", Description 1="CONN HEADER 10POS .100 STR TIN", Fastening Type=Push-Pull, Features=-, Ingress Protection=-, Insulation Height="0.100\" (2.54mm)", Insulation Material=-, Manufacturer_Part_Number=67997-410HLF, Manufacturer Part Number 1=67997-410HLF, Mated Stacking Heights=-, Mounting Type="Through Hole", Number of Positions=10, Number of Positions Loaded=All, Number of Rows=2, Operating Temperature=-, Overall Contact Length="0.450\" (11.43mm)", Packaging=Bulk, Part Status=Active, Pitch - Mating="0.100\" (2.54mm)", Pricing 1="1=0.27, 10=0.259, 100=0.1811, 500=0.1552, 1000=0.12933, 5000=0.11085, 10000=0.10346 (USD)", RefDes=RefDes, RoHS="RoHS Compliant", Row Spacing - Mating="0.100\" (2.54mm)", Shrouding=Unshrouded, Stock 1=36400, Style="Board to Board", Supplier 1=Digi-Key, Termination=Solder, Type=DEV, Vendor="Amphenol FCI", Voltage Rating=-
J2: "CONN SATA RECEPT 22POS SMD R/A", Manufacturer 1="Molex, LLC", Manufacturer Part Number 1=0470182000, Supplier Part Number 1=WM4050-ND, .Checked PCB=USED, .Checked SCH=USED, Category="Connectors, Interconnects", ComponentLink1Description=https://www.molex.com/pdm_docs/sd/470182000_sd.pdf, ComponentLink1URL=https://www.molex.com/pdm_docs/sd/470182000_sd.pdf, Connector Style=Receptacle, Connector Type=SATA, Contact Finish=Gold, Contact Finish Thickness=Flash, Description 1="CONN SATA RECEPT 22POS SMD R/A", Features="Board Lock", Mounting Type="Surface Mount, Right Angle", Number of Positions=22, Packaging=Tray, Part Status=Active, Pricing 1="1=6.29, 10=6.028, 25=5.5036, 50=5.2414, 100=4.9793, 250=4.4552, 500=4.19312, 1000=3.66898, 2500=3.48553 (USD)", RoHS="RoHS Compliant", Stock 1=2490, Supplier 1=Digi-Key, Termination=Solder
J3: library part D2510-6002-AR, "CONN HEADER 10POS VERT 10GOLD", Color=Black, Manufacturer=3M, Supplier Part Number 1=MHC10E-ND, .Checked PCB=USED, .Checked SCH=USED, .Creator=MM, Category="Connectors, Interconnects", ComponentLink1Description=http://multimedia.3m.com/mws/mediawebserver?66666UuZjcFSLXTtm8T_oxMcEVuQEcuZgVs6EVs6E666666--, ComponentLink1URL=http://multimedia.3m.com/mws/mediawebserver?66666UuZjcFSLXTtm8T_oxMcEVuQEcuZgVs6EVs6E666666--, Connector Type="Header, Shrouded", Contact Finish=Gold, Contact Finish Thickness="10µin (0.25µm)", Contact Mating Length="0.243\" (6.17mm)", Contact Type="Male Pin", Fastening Type=-, Features=-, Manufacturer Part Number=D2510-6002-AR, Mounting Type="Through Hole", Number of Positions=10, Number of Positions Loaded=All, Number of Rows=2, Packaging=Bulk, Pitch="0.100\" (2.54mm)", Pricing 1="1=1.57, 10=1.421, 50=1.276, 100=1.218, 250=1.102, 500=1.015, 1000=0.87, 2500=0.812, 5000=0.7714 (USD)", RoHS="RoHS Compliant", Row Spacing="0.100\" (2.54mm)", Stock 1=1080, Supplier 1=Digi-Key, Termination=Solder
J4: "CONN MOD JACK 8POS R/A G-Y PCB", LED Color="Yellow - Green", Manufacturer=Tyco, Operating Temperature="-40°C ~ 85°C", Ratings=Cat5, Supplier Part Number=A97715-ND, .Checked PCB=USED, .Checked SCH=USED, Category="Connectors, Interconnects", ComponentLink1Description=http://documents.tycoelectronics.com/commerce/DocumentDelivery/DDEController?Action=srchrtrv&DocNm=406549&DocType=CD&DocLang=EN, ComponentLink1URL=http://documents.tycoelectronics.com/commerce/DocumentDelivery/DDEController?Action=srchrtrv&DocNm=406549&DocType=CD&DocLang=EN, Connector Type=Jack, Contact Finish=Gold, Contact Material="Phosphor Bronze", Features="Board Lock", Housing Material=Thermoplastic, Manufacturer Part Number=2-406549-1, Mounting Type="Through Hole", Number of Ports=1, Number of Positions="8p8c (RJ45, Ethernet)", Number of Positions/Contacts="8p8c (RJ45, Ethernet)", Number of Rows=1, Orientation="90° Angle (Right)", Packaging=Tray, Price 1k [$]=1.73278, Pricing 1="1=3.42 (USD)", RoHS="RoHS Compliant", Shielding="Shielded, EMI Finger", Stock 1=9021, Supplier=Digikey, Supplier 1=Digi-Key, Supplier Part Number 1=A97715-ND, Tab Direction=Up, Termination=Solder
J5: "CONN RCPT 19POS HDMI RT ANG SMD", Manufacturer="Molex Connector Corporation", Operating Temperature="-20°C to +85°C", Supplier Part Number=WM19086CT-ND, .Checked SCH=CHK, Category="Connectors, Interconnects", ComponentLink1Description=http://www.molex.com/pdm_docs/sd/471510001_sd.pdf, ComponentLink1URL=http://www.molex.com/pdm_docs/sd/471510001_sd.pdf, Connector Type=HDMI, Family="USB, IEEE-1394 (Firewire), DVI, HDMI", Features="Detent Lock", Gender=Receptacle, Ingress Protection=-, Manufacturer Part Number=47151-0001, Mounting Type="Surface Mount, Right Angle, Horizontal", Number of Contacts=19, Number of Positions=19, Packaging="Cut Tape (CT)", Pitch="0.50mm (.020\")", Price 1k [$]=1.74610, Pricing 1="1=3.1, 10=2.57, 50=2.1456, 100=1.9034 (USD)", RoHS="RoHS Compliant", Specifications=-, Stock 1=2756, Supplier=Digikey, Supplier 1=Digi-Key, Supplier Part Number 1=WM19086CT-ND
J6: library part "USB 3", "USB 3.0 RA DUAL REC TH TYPE A", Current Rating="0.25A, 1.8A", Insulation Color=Blue, Manufacturer 1="Molex, LLC", Manufacturer Part Number 1=0484060003, Material Flammability Rating="UL94 HB", Operating Temperature="-20°C ~ 85°C", Voltage - Rated=30VAC/DC, .Checked PCB=USED, .Checked SCH=USED, Category="Connectors, Interconnects", ComponentLink1Description=https://www.molex.com/pdm_docs/sd/484060003_sd.pdf, ComponentLink1URL=https://www.molex.com/pdm_docs/sd/484060003_sd.pdf, Connector Type="USB - A, Stacked", Contact Finish=Gold, Description 1="USB 3.0 RA DUAL REC TH TYPE A", Features="Board Lock", Gender=Receptacle, Ingress Protection=-, Mating Cycles=5000, Mounting Feature=Horizontal, Mounting Type="Through Hole, Right Angle", Number of Contacts=18, Packaging=Tray, Part Status=Active, Pricing 1="1=2.23, 10=2.026, 25=1.902, 50=1.8194, 100=1.7367, 250=1.57132, 500=1.44726, 1000=1.2405, 2500=1.1578 (USD)", RoHS="RoHS Compliant", Shell/Shielding Material="Steel, Stainless", Shielding=Shielded, Specifications="USB 3.0 (USB 3.1 Gen 1, Superspeed)", Stock 1=11990, Supplier 1=Digi-Key, Supplier Part Number 1=WM10420-ND, Termination=Solder
J7: "CONN RCPT R/A 4OVER4POS GOLD PCB", Manufacturer="TE Connectivity", Supplier Part Number=A31728-ND, .Checked PCB=USED, .Checked SCH=USED, Category="Connectors, Interconnects", ComponentLink1Description=http://documents.tycoelectronics.com/commerce/DocumentDelivery/DDEController?Action=srchrtrv&DocNm=5787617&DocType=CD&DocLang=EN, ComponentLink1URL=http://documents.tycoelectronics.com/commerce/DocumentDelivery/DDEController?Action=srchrtrv&DocNm=5787617&DocType=CD&DocLang=EN, Connector Type="USB - A, Stacked", Family="USB, IEEE-1394 (Firewire), DVI, HDMI", Features="Board Lock", Gender=Receptacle, Ingress Protection=-, Manufacturer Part Number=5787617-1, Mounting Type="Through Hole, Right Angle, Horizontal", Number of Contacts=8, Packaging=Tray, Price 1k [$]=1.68753, Pricing 1="1=3.33, 10=3.197, 25=2.9308, 50=2.7978, 100=2.6645, 250=2.33144, 500=2.26484, 1000=1.93178, 2500=1.79855 (USD)", RoHS="RoHS Compliant", Specifications="USB 2.0", Stock 1=5401, Supplier=Digikey, Supplier 1=Digi-Key, Supplier Part Number 1=A31728-ND
J8: "CONN PLUG 220POS 0.5MM DUAL SMT", Manufacturer 1="TE Connectivity AMP Connectors", Supplier Part Number 1=A107335-ND, Category="Connectors, Interconnects", ComponentLink1Description=https://www.te.com/commerce/DocumentDelivery/DDEController?Action=srchrtrv&DocNm=6318491&DocType=Customer+Drawing&DocLang=English, ComponentLink1URL=https://www.te.com/commerce/DocumentDelivery/DDEController?Action=srchrtrv&DocNm=6318491&DocType=Customer+Drawing&DocLang=English, Connector Type="Plug, Outer Shroud Contacts", Contact Finish=Gold, Contact Finish Thickness="8.00µin (0.203µm)", Description 1="CONN PLUG 220POS 0.5MM DUAL SMT", Features="Board Guide, Ground Plate", Height Above Board="0.293\" (7.45mm)", Manufacturer Part Number 1=3-6318491-6, Mated Stacking Heights="5mm, 8mm", Mounting Type="Surface Mount", Number of Positions=220, Packaging=Tray, Part Status=Active, Pitch="0.020\" (0.50mm)", Pricing 1="1=18.41, 10=17.21, 30=15.60933, 60=15.209, 120=13.60792, 270=12.80748, 510=12.56737 (USD)", RoHS="RoHS Compliant", Stock 1=4181, Supplier 1=Digi-Key